# Allegro board mib_rev2_v143.brd
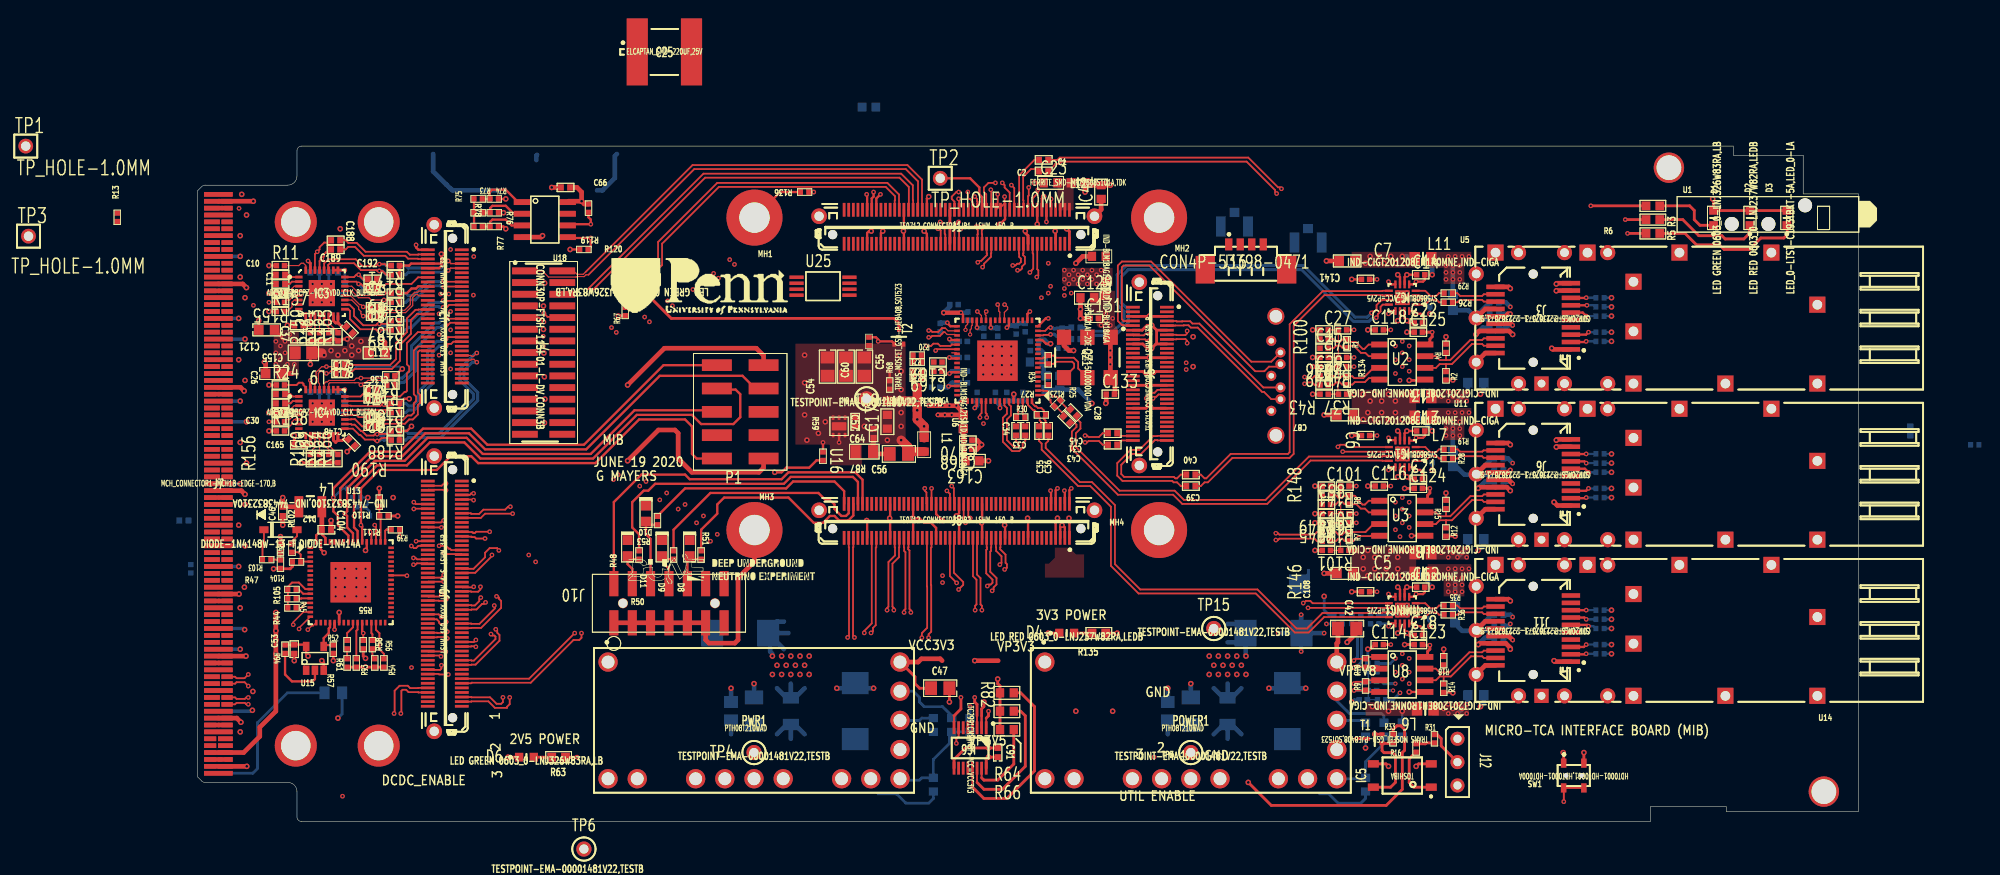
[diagram p0: board, top side]
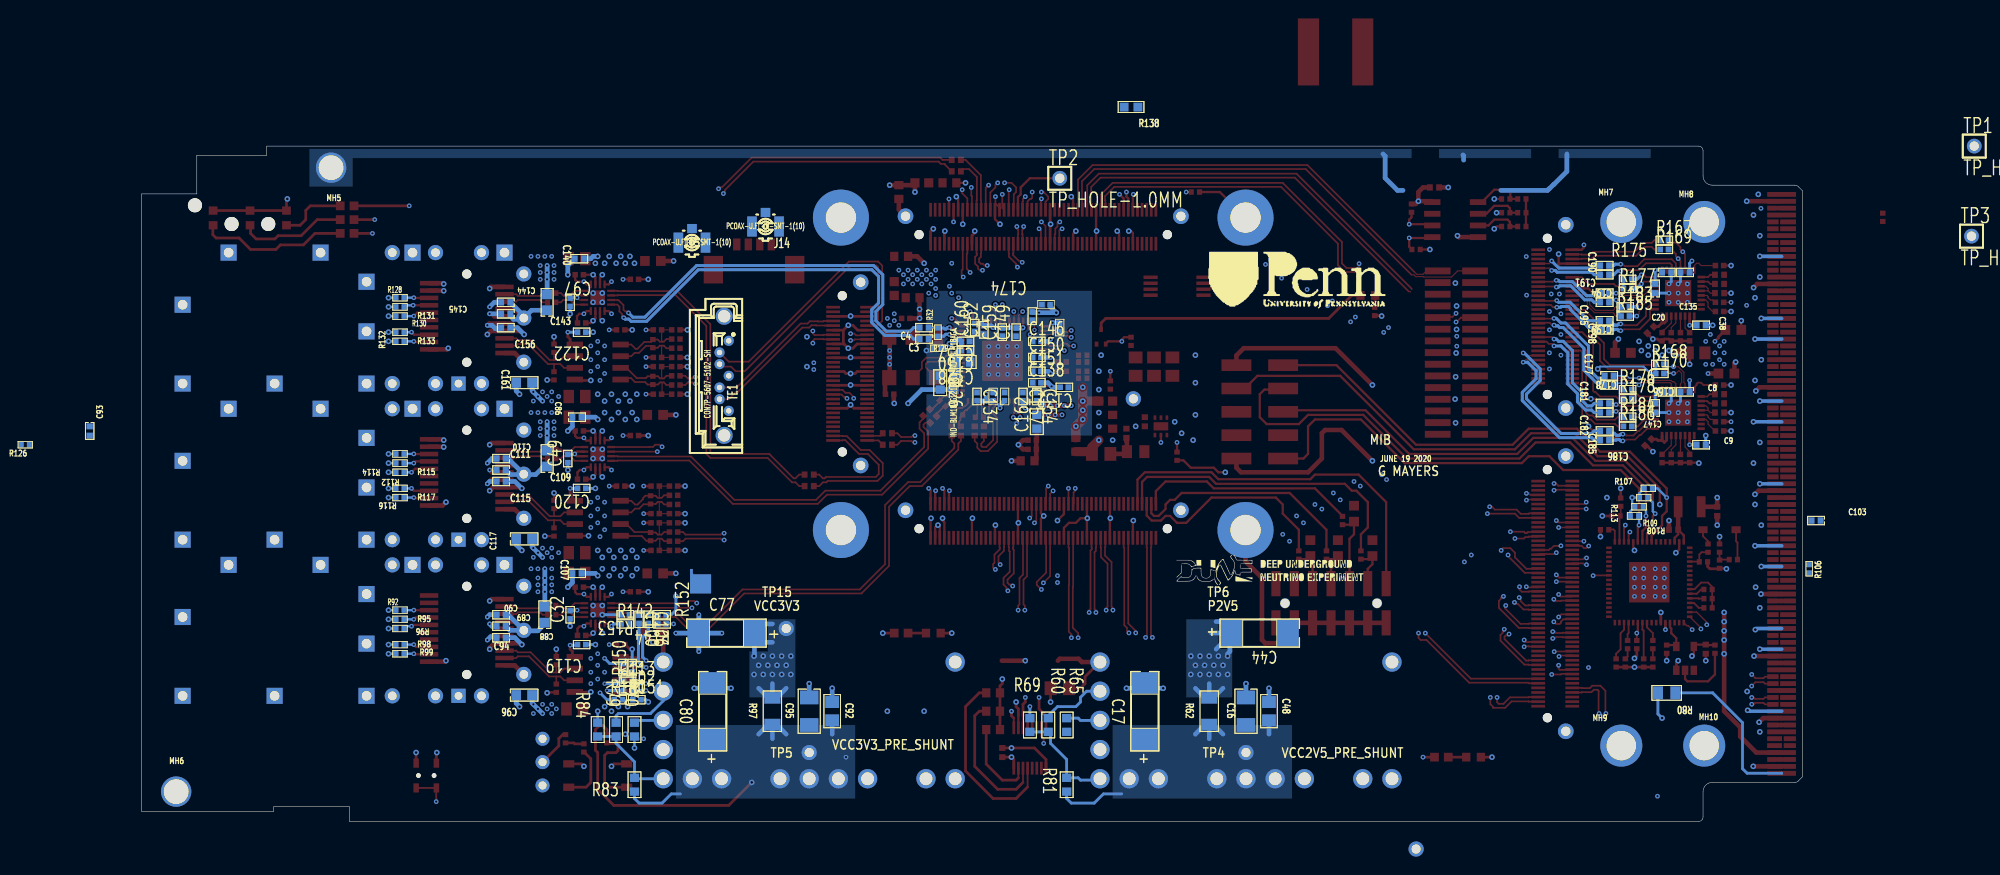
[diagram p1: board, bottom side, seen from below]

Outline 180.6 x 73.5 mm; copper layers: TOP, 02_GND, 03_SIG1, 04_GND, 05_PWR1, 06_GND, 07_SIG2, 08_GND, 09_SIG3, BOTTOM. Coordinates in mm from the lower left corner of the outline.
Outline path: 0,68.65 0.46,69.11 arc(0.62,69.21) 0.8,69.25 0.83,69.25 9.8,69.25 arc(10.51,69.54) 10.8,70.25 10.8,73.01 arc(10.95,73.36) 11.3,73.5 167,73.5 167,72.5 174.6,72.5 174.6,68.3 180.6,68.3 180.6,1.1 166.24,1.1 166.24,1.6 158,1.6 158,0 11.27,0 arc(11.06,0.06) 10.89,0.21 arc(10.82,0.34) 10.8,0.49 10.8,3.26 arc(10.5,3.96) 9.8,4.25 0.8,4.25 arc(0.62,4.29) 0.46,4.39 0,4.85 0,68.65

## Design rules (mm)
constraint set DEFAULT: min track width 0.127
net group AMC_N_PS: nets AMC_N_PS<0> AMC_N_PS<1>
net group AUXIO_0: nets AUXIO_N0 AUXIO_P0
net group AUXIO_1: nets AUXIO_N1 AUXIO_P1
net group AUXIO_2: nets AUXIO_N2 AUXIO_P2
net group AUXIO_3: nets AUXIO_N3 AUXIO_P3
net group AUXIO_4: nets AUXIO_N4 AUXIO_P4
net group AUXIO_5: nets AUXIO_N5 AUXIO_P5
net group AUXIO_6: nets AUXIO_N6 AUXIO_P6
net group AUXIO_7: nets AUXIO_N7 AUXIO_P7
net group CLK_TST: nets CLK_TST_N CLK_TST_P
net group CLKIN0: nets CLKIN0_N CLKIN0_P
net group CLKIN1: nets CLKIN1_N CLKIN1_P
net group CLKIN2: nets CLKIN2_N CLKIN2_P
net group CLKIN3: nets CLKIN3_N CLKIN3_P
net group DP1: nets RCLK_N0 RCLK_N1
net group DP2: nets RCLK_P0 RCLK_P1
net group DP_AUX_GBE_RX: nets AUX_GBE_RX_N AUX_GBE_RX_P
net group DP_AUX_GBE_TX: nets AUX_GBE_TX_N AUX_GBE_TX_P
net group DP_CLK0: nets CLK_N<0> CLK_P<0>
net group DP_CLK1: nets CLK_N<1> CLK_P<1>
net group DP_DATA_IN0: nets DATA_IN_N<0> DATA_IN_P<0>
net group DP_DATA_IN1: nets DATA_IN_N<1> DATA_IN_P<1>
net group DP_DATA_IN2: nets DATA_IN_N<2> DATA_IN_P<2>
net group DP_DATA_IN3: nets DATA_IN_N<3> DATA_IN_P<3>
net group DP_DATA_IN4: nets DATA_IN_N<4> DATA_IN_P<4>
net group DP_DATA_IN5: nets DATA_IN_N<5> DATA_IN_P<5>
net group DP_DATA_IN6: nets DATA_IN_N<6> DATA_IN_P<6>
net group DP_DATA_IN7: nets DATA_IN_N<7> DATA_IN_P<7>
net group DP_DATA_IN8: nets DATA_IN_N<8> DATA_IN_P<8>
net group DP_DATA_IN9: nets DATA_IN_N<9> DATA_IN_P<9>
net group DP_DATA_IN10: nets DATA_IN_N<10> DATA_IN_P<10>
net group DP_DATA_IN11: nets DATA_IN_N<11> DATA_IN_P<11>
net group DP_DATA_OUT0: nets DATA_OUT_N<0> DATA_OUT_P<0>
net group DP_DATA_OUT1: nets DATA_OUT_N<1> DATA_OUT_P<1>
net group DP_DATA_OUT2: nets DATA_OUT_N<2> DATA_OUT_P<2>
net group DP_DATA_OUT3: nets DATA_OUT_N<3> DATA_OUT_P<3>
net group DP_DATA_OUT4: nets DATA_OUT_N<4> DATA_OUT_P<4>
net group DP_DATA_OUT5: nets DATA_OUT_N<5> DATA_OUT_P<5>
net group DP_DATA_OUT6: nets DATA_OUT_N<6> DATA_OUT_P<6>
net group DP_DATA_OUT7: nets DATA_OUT_N<7> DATA_OUT_P<7>
net group DP_DATA_OUT8: nets DATA_OUT_N<8> DATA_OUT_P<8>
net group DP_DATA_OUT9: nets DATA_OUT_N<9> DATA_OUT_P<9>
net group DP_DATA_OUT10: nets DATA_OUT_N<10> DATA_OUT_P<10>
net group DP_DATA_OUT11: nets DATA_OUT_N<11> DATA_OUT_P<11>
net group DP_DC_REF_CLK0: nets DC_REF_CLK_N<0> DC_REF_CLK_P<0>
net group DP_DC_REF_CLK1: nets DC_REF_CLK_N<1> DC_REF_CLK_P<1>
net group DP_DC_REF_CLK2: nets DC_REF_CLK_N<2> DC_REF_CLK_P<2>
net group DP_DC_REF_CLK3: nets DC_REF_CLK_N<3> DC_REF_CLK_P<3>
net group DP_DC_REF_CLK4: nets DC_REF_CLK_N<4> DC_REF_CLK_P<4>
net group DP_DC_REF_CLK5: nets DC_REF_CLK_N<5> DC_REF_CLK_P<5>
net group DP_DC_REF_CLK6: nets DC_REF_CLK_N<6> DC_REF_CLK_P<6>
net group DP_DC_REF_CLK7: nets DC_REF_CLK_N<7> DC_REF_CLK_P<7>
net group DP_DC_REF_CLK8: nets DC_REF_CLK_N<8> DC_REF_CLK_P<8>
net group DP_DC_REF_CLK9: nets DC_REF_CLK_N<9> DC_REF_CLK_P<9>
net group DP_DC_REF_CLK10: nets DC_REF_CLK_N<10> DC_REF_CLK_P<10>
net group DP_DC_REF_CLK11: nets DC_REF_CLK_N<11> DC_REF_CLK_P<11>
net group DP_DFF_REF_CLK0: nets DFF_REF_CLK_N<0> DFF_REF_CLK_P<0>
net group DP_DFF_REF_CLK1: nets DFF_REF_CLK_N<1> DFF_REF_CLK_P<1>
net group DP_DFF_REF_CLK2: nets DFF_REF_CLK_N<2> DFF_REF_CLK_P<2>
net group DP_GBE_RX: nets GBE_RX_N GBE_RX_P
net group DP_GBE_TX: nets GBE_TX_N GBE_TX_P
net group DP_REF_CLK0: nets REF_CLK_N<0> REF_CLK_P<0>
net group DP_REF_CLK1: nets REF_CLK_N<1> REF_CLK_P<1>
net group DP_REF_CLK2: nets REF_CLK_N<2> REF_CLK_P<2>
net group DP_REF_CLK3: nets REF_CLK_N<3> REF_CLK_P<3>
net group DP_REF_CLK4: nets REF_CLK_N<4> REF_CLK_P<4>
net group DP_REF_CLK5: nets REF_CLK_N<5> REF_CLK_P<5>
net group DP_REF_CLK6: nets REF_CLK_N<6> REF_CLK_P<6>
net group DP_REF_CLK7: nets REF_CLK_N<7> REF_CLK_P<7>
net group DP_REF_CLK8: nets REF_CLK_N<8> REF_CLK_P<8>
net group DP_REF_CLK9: nets REF_CLK_N<9> REF_CLK_P<9>
net group DP_REF_CLK10: nets REF_CLK_N<10> REF_CLK_P<10>
net group DP_REF_CLK11: nets REF_CLK_N<11> REF_CLK_P<11>
net group DP_SFP_TD0: nets SFP_TD_N<0> SFP_TD_P<0>
net group DP_SFP_TD1: nets SFP_TD_N<1> SFP_TD_P<1>
net group DP_SFP_TD2: nets SFP_TD_N<2> SFP_TD_P<2>
net group DP_TIMING.UPSTREAM_DATA0: nets TIMING.UPSTREAM_DATA_N<0> TIMING.UPSTREAM_DATA_P<0>
net group DP_TIMING.UPSTREAM_DATA1: nets TIMING.UPSTREAM_DATA_N<1> TIMING.UPSTREAM_DATA_P<1>
net group DP_XTAL: nets XA XB
net group DPDATA_FROM_UPSTREAM0: nets DATA_FROM_UPSTREAM_N<0> DATA_FROM_UPSTREAM_P<0>
net group DPDATA_FROM_UPSTREAM1: nets DATA_FROM_UPSTREAM_N<1> DATA_FROM_UPSTREAM_P<1>
net group DPDATA_FROM_UPSTREAM2: nets DATA_FROM_UPSTREAM_N<2> DATA_FROM_UPSTREAM_P<2>
net group DPDFF_CLK0: nets DFF_CLK_N<0> DFF_CLK_P<0>
net group DPDFF_CLK1: nets DFF_CLK_N<1> DFF_CLK_P<1>
net group DPDFF_CLK2: nets DFF_CLK_N<2> DFF_CLK_P<2>
net group DPSFP_DATA_OUT0: nets SFP_DATA_OUT_N<0> SFP_DATA_OUT_P<0>
net group DPSFP_DATA_OUT1: nets SFP_DATA_OUT_N<1> SFP_DATA_OUT_P<1>
net group DPSFP_DATA_OUT2: nets SFP_DATA_OUT_N<2> SFP_DATA_OUT_P<2>
net group DPUDATA_IN0: nets UDATA_IN_N<0> UDATA_IN_P<0>
net group DPUDATA_IN1: nets UDATA_IN_N<1> UDATA_IN_P<1>
net group DPUDATA_IN2: nets UDATA_IN_N<2> UDATA_IN_P<2>
net group FBCLK: nets FBCLK_N FBCLK_P
net group REFCLK_OUT0: nets REFCLK_OUT0_N REFCLK_OUT0_P
net group REFCLK_OUT1: nets REFCLK_OUT1_N REFCLK_OUT1_P
net group SCOPE: nets SCOPE_N SCOPE_P
net group SFP0_CLKGEN: nets SFP0_CLKGEN_N SFP0_CLKGEN_P
net group SFP1_CLKGEN: nets SFP1_CLKGEN_N SFP1_CLKGEN_P
net group SFP2_CLKGEN: nets SFP2_CLKGEN_N SFP2_CLKGEN_P
net group AMC_GA: nets AMC_GA<0> AMC_GA<1> AMC_GA<2>
net group BP_1: nets AMC_N_ENABLE IMPB_SCL IMPB_SDA PWR_ON TCK_2 TDI_2 TDO_2 TMS_2
net group CLKGEN_IO_1: nets CLK_INTR CLK_LOL CLK_RST CLK_SCL CLK_SDA CLK_SEL0 CLK_SEL1
net group POWER: nets DCDC_2V5_PG DCDC_3V3_PG DCDC_ENABLE LDO_1V8_PG SENSE_I2C_SCL SENSE_I2C_SDA
net group SFP_LOS: nets SFP_LOS<0> SFP_LOS<1> SFP_LOS<2>
net group SFP_RATE_SELECT: nets SFP_RATE_SELECT<0> SFP_RATE_SELECT<1> SFP_RATE_SELECT<2>
net group SFP_RD_N: nets SFP_RD_N<0> SFP_RD_N<1> SFP_RD_N<2>
net group SFP_RD_P: nets SFP_RD_P<0> SFP_RD_P<1> SFP_RD_P<2>
net group SFP_SCL: nets SFP_SCL<0> SFP_SCL<1> SFP_SCL<2>
net group SFP_SDA: nets SFP_SDA<0> SFP_SDA<1> SFP_SDA<2>
net group SFP_TX_DISABLE: nets SFP_TX_DISABLE<0> SFP_TX_DISABLE<1> SFP_TX_DISABLE<2>
net group SFP_TX_FAULT: nets SFP_TX_FAULT<0> SFP_TX_FAULT<1> SFP_TX_FAULT<2>
net group TIMING.UPSTREAM_DATA_N: nets TIMING.UPSTREAM_DATA_N<2>
net group TIMING.UPSTREAM_DATA_P: nets TIMING.UPSTREAM_DATA_P<2>
net group UPSTREAM_DATA_N_: nets UPSTREAM_DATA_N_<0> UPSTREAM_DATA_N_<1> UPSTREAM_DATA_N_<2>
net group UPSTREAM_DATA_P: nets UPSTREAM_DATA_P<0> UPSTREAM_DATA_P<1> UPSTREAM_DATA_P<2>
net group VIN: nets VP12

## Placement (name value [footprint] x y rotation side)
C1  0.1UF  [CAP0402]  92.01 70.75 0 top
C2  0.1UF  [CAP0402]  92.01 72 0 top
C3  0.1UF  [CAP0402]  95.51 52.5 180 bottom
C4  0.1UF  [CAP0402]  95.51 53.75 180 bottom
C5  1uF  [C0402]  127.01 25 0 top
C6  1uF  [C0402]  127.01 42 0 top
C7  1uF  [C0402]  127.01 59 0 top
C8  100nF  [CAP0402]  12.76 46.75 180 bottom
C9  1UF  [CAP0402]  11.01 41 180 bottom
C10  0.1UF  [CAP0402]  9.01 59.5 0 top
C11  0.1UF  [CAP0402]  9.01 58.5 0 top
C12  100nF  [C0402]  133.01 25.5 0 top
C13  100nF  [C0402]  133.01 42.5 0 top
C14  100nF  [C0402]  133.01 59.5 0 top
C15  100nF  [C0402]  122.51 51.5 0 top
C16  100UF  [CAP1206]  60.51 12 90 bottom
C17  470UF  [CAP2917]  71.51 12 90 bottom
C18  1nF  [C0402]  132.76 20.25 0 top
C19  100nF  [CAP0402]  14.76 59.75 0 bottom
C20  1UF  [CAP0402]  16.01 58 270 bottom
C21  1nF  [C0402]  132.76 37.25 0 top
C22  1nF  [C0402]  132.76 54.25 0 top
C23  1uF  [C0603]  92.76 69.5 0 top
C24  100nF  [C0402]  122.51 47.5 0 top
C25  220uF  [CTE_VISHAY_597D-M]  50.76 83.75 0 top
C26  0.1UF  [CAP0402]  9.01 46.5 0 top
C27  100nF  [C0402]  122.51 52.5 0 top
C28  0.1UF  [CAP0402]  95.26 44.5 135 top
C29  100nF  [C0402]  122.51 48.5 0 top
C30  0.1UF  [CAP0402]  9.01 45.5 0 top
C31  0.1UF  [CAP0402]  94.51 43.75 135 top
C32  100nF  [C0402]  134.01 22.5 90 bottom
C33  0.1UF  [CAP0402]  90.01 42.5 90 top
C34  0.1UF  [CAP0402]  89.01 42.5 90 top
C35  0.1UF  [CAP0402]  91.51 42.5 90 top
C36  0.1UF  [CAP0402]  92.51 42.5 90 top
C37  100nF  [CAP0402]  11.01 54 0 top
C38  1UF  [CAP0402]  11.01 54 180 bottom
C39  0.1UF  [CAP0402]  108.01 36.5 0 top
C40  0.1UF  [CAP0402]  108.01 37.75 0 top
C41  1uF  [C0603]  98.26 68.5 90 top
C42  0.1UF  [CAP0805]  125.01 21 0 top
C43  0.1UF  [CAP0402]  99.51 41 180 top
C44  470UF  [CAP2917]  59.01 20.5 180 bottom
C45  0.1UF  [CAP0402]  99.51 42.25 180 top
C46  0.47UF  [CAP0402]  9.26 33.75 270 top
C47  0.1UF  [CAP0805]  80.76 14.5 0 top
C48  0.1UF  [CAP0805]  58.01 12 90 bottom
C49  100nF  [C0402]  134.26 39.5 90 bottom
C53  0.1UF  [CAP0402]  10.51 18.75 270 top
C54  47UF  [CAP0805]  68.51 49.5 90 top
C55  47UF  [CAP0805]  72.51 49.5 90 top
C56  47UF  [CAP0805]  76.26 40 0 top
C57  0.1UF  [CAP0402]  71.51 43.5 270 top
C60  47UF  [CAP0805]  70.51 49.5 90 top
C64  0.1UF  [CAP0402]  73.51 42.25 90 top
C66  0.1UF  [CAP0402]  40.01 69 180 top
C77  470UF  [CAP2917]  117.01 20.5 0 bottom
C80  470UF  [CAP2917]  118.51 12 90 bottom
C86  0.1UF  [CAP0402]  133.26 44 0 bottom
C87  10UF  [CAP0603]  124.76 44.25 180 top
C88  22UF  [CAP0603]  136.76 22.5 270 bottom
C89  1UF  [CAP0402]  141.51 22.5 180 bottom
C90  0.1UF  [CAP0402]  141.51 21.25 180 bottom
C91  0.1UF  [CAP0402]  87.01 7.5 270 top
C92  0.1UF  [CAP0805]  105.51 12 90 bottom
C93  0.1UF  [CAP0402]  186.26 42.5 90 bottom
C94  0.1UF  [CAP0402]  141.51 20 180 bottom
C95  100UF  [CAP1206]  108.01 12 90 bottom
C96  22UF  [CAP0603]  139.01 13.75 0 bottom
C97  100nF  [C0402]  134.01 56.5 90 bottom
C98  100nF  [C0402]  122.76 34.5 0 top
C99  100nF  [C0402]  122.76 30.5 0 top
C100  100nF  [C0402]  126.51 22 270 bottom
C101  100nF  [C0402]  122.76 35.5 0 top
C102  100nF  [C0402]  127.76 14.25 180 bottom
C103  0.1UF  [CAP0402]  -1.49 32.75 180 bottom
C104  0.1UF  [CAP0402]  14.01 31.75 0 top
C105  100nF  [C0402]  122.76 31.5 0 top
C106  100nF  [C0402]  125.51 22 270 bottom
C107  0.1UF  [CAP0402]  133.26 27 0 bottom
C108  10UF  [CAP0603]  124.76 27 180 top
C109  22UF  [CAP0603]  136.51 39.5 270 bottom
C110  1UF  [CAP0402]  141.51 39.5 180 bottom
C111  0.1UF  [CAP0402]  141.51 38.25 180 bottom
C112  10UF  [CAP0603]  19.51 51 0 top
C113  100nF  [C0402]  127.76 15.25 180 bottom
C114  1uF  [C0402]  128.51 19.25 0 top
C115  0.1UF  [CAP0402]  141.51 37 180 bottom
C116  1uF  [C0402]  128.51 36.5 0 top
C117  22UF  [CAP0603]  139.01 30.75 0 bottom
C118  1uF  [C0402]  128.51 53.5 0 top
C119  100nF  [C0402]  132.76 19.25 0 bottom
C120  100nF  [C0402]  132.76 36.25 0 bottom
C121  10UF  [CAP0603]  7.51 53.5 180 top
C122  100nF  [C0402]  132.76 53.25 0 bottom
C123  1nF  [C0402]  132.76 19.25 0 top
C124  1nF  [C0402]  132.76 36.25 0 top
C125  1nF  [C0402]  132.76 53.25 0 top
C126  10uF  [C0603]  93.76 47.75 270 bottom
C127  10uF  [C0603]  98.01 61.5 0 top
C128  10uF  [C0603]  91.26 50 0 bottom
C129  10uF  [C0603]  96.76 57 0 top
C130  1uF  [C0402]  91.01 51.25 0 bottom
C131  1uF  [C0402]  97.51 54.75 0 top
C132  1uF  [C0402]  80.26 47.25 0 bottom
C133  100nF  [C0402]  99.26 46.5 0 top
C134  1uF  [C0402]  89.76 46.25 270 bottom
C135  100nF  [CAP0402]  12.76 59.75 180 bottom
C136  100nF  [CAP0402]  16.51 53.5 135 top
C137  100nF  [C0402]  91.01 52.25 0 bottom
C138  100nF  [C0402]  83.26 47.75 180 bottom
C139  100nF  [CAP0402]  9.01 44.5 0 top
C140  0.1UF  [CAP0402]  133.01 61.25 0 bottom
C141  10UF  [CAP0603]  125.01 61 180 top
C142  100nF  [C0402]  88.01 46.25 270 bottom
C143  22UF  [CAP0603]  136.51 56.5 270 bottom
C144  1UF  [CAP0402]  141.01 56.5 180 bottom
C145  0.1UF  [CAP0402]  141.01 55.25 180 bottom
C146  100nF  [C0402]  83.26 52.25 180 bottom
C147  1UF  [CAP0402]  16.01 45 270 bottom
C148  100nF  [CAP0402]  16.76 41.25 135 top
C149  100nF  [C0402]  85.51 53.25 90 bottom
C150  100nF  [C0402]  83.26 50.5 180 bottom
C151  100nF  [C0402]  83.26 49 180 bottom
C152  100nF  [C0402]  89.01 53.5 90 bottom
C153  100nF  [C0402]  80.76 53.75 90 bottom
C154  100nF  [C0402]  83.26 46.25 270 bottom
C155  10UF  [CAP0603]  8.26 48.75 180 top
C156  0.1UF  [CAP0402]  141.01 53.75 180 bottom
C157  100nF  [C0402]  84.76 46.25 270 bottom
C158  100nF  [C0402]  86.76 46.25 270 bottom
C159  100nF  [C0402]  87.01 53.25 90 bottom
C160  1uF  [C0402]  90.01 53.75 90 bottom
C161  22UF  [CAP0603]  139.01 47.75 0 bottom
C162  10uF  [C0603]  83.26 43.5 90 bottom
C163  10uF  [C0603]  84.26 39.25 180 top
C165  100nF  [CAP0402]  11.01 41 0 top
C166  100nF  [CAP0402]  14.76 46.75 0 bottom
C167  100nF  [C0402]  80.51 50 180 top
C168  1uF  [C0402]  83.76 40.5 180 top
C169  100nF  [C0402]  80.51 49 180 top
C170  100nF  [C0402]  83.76 41.5 180 top
C171  10uF  [C0603]  75.01 43.5 90 top
C172  10uF  [C0603]  79.01 41 90 top
C173  1uF  [C0402]  82.26 56.25 180 bottom
C174  100nF  [C0402]  83.76 55 90 bottom
C175  100nF  [CAP0402]  15.51 49.75 0 top
C176  100nF  [CAP0402]  15.51 48.75 0 top
C177  100nF  [CAP0402]  21.01 48.5 0 bottom
C178  100nF  [CAP0402]  21.01 47.5 0 bottom
C179  100nF  [CAP0402]  19.01 47 0 top
C180  100nF  [CAP0402]  19.01 46 0 top
C181  100nF  [CAP0402]  21.51 45.5 0 bottom
C182  100nF  [CAP0402]  21.51 44.5 0 bottom
C183  100nF  [CAP0402]  19.01 44 0 top
C184  100nF  [CAP0402]  19.01 43 0 top
C185  100nF  [CAP0402]  21.51 42.5 0 bottom
C186  100nF  [CAP0402]  21.51 41.5 0 bottom
C187  100nF  [CAP0402]  9.01 57.5 0 top
C188  100nF  [CAP0402]  15.01 63.25 0 top
C189  100nF  [CAP0402]  15.01 62.25 0 top
C190  100nF  [CAP0402]  21.51 60.5 0 bottom
C191  100nF  [CAP0402]  21.51 59.5 0 bottom
C192  100nF  [CAP0402]  19.01 59 0 top
C193  100nF  [CAP0402]  19.01 58 0 top
C194  100nF  [CAP0402]  21.51 57.5 0 bottom
C195  100nF  [CAP0402]  21.51 56.5 0 bottom
C196  100nF  [CAP0402]  19.26 56 0 top
C197  100nF  [CAP0402]  19.26 55 0 top
C198  100nF  [CAP0402]  21.51 54.5 0 bottom
C199  100nF  [CAP0402]  21.51 53.5 0 bottom
D1  GREEN  [LEDC1608X80N]  164.85 65.68 90 top
D2  RED  [LEDC1608X80N]  168.81 65.68 90 top
D3  LTST-C170TBKT  [LEDC1608X80N]  172.83 65.68 90 top
D4  RED  [LEDC1608X80N]  94.51 20.5 0 top
D5  GREEN  [LEDC1608X80N]  47.26 57.25 180 top
D6  GREEN  [LEDC1608X80N]  35.76 7 0 top
D8  PGB1010603NR  [D0603]  53.51 29.75 270 top
D9  PGB1010603NR  [D0603]  50.51 29.75 270 top
D10  PGB1010603NR  [D0603]  48.76 33.5 270 top
D11  PGB1010603NR  [D0603]  46.76 29.75 270 top
D12  1N4148  [SOD123]  9.01 31.75 0 top
IC1  -  [QFN50P300X300X90-17N-S160]  131.01 40 180 top
IC2  -  [QFN50P300X300X90-17N-S160]  131.01 57 180 top
IC3  -  [QFN50P500X500X100-33N-S285]  13.51 57.5 0 top
IC4  -  [QFN50P500X500X100-33N-S285]  13.51 44.5 0 top
IC5  -  [TOSHIBA_11-4M1S]  131.01 5 180 top
IC6  -  [SOP50P490X110-16N]  84.01 8 270 top
J1  LSHM-150-03.0-L-DV-A-S-K-TR  [SAMTEC_LSHM-150-04-0-L-DV-A-S]  82.56 64.77 0 top
J2  LSHM-130-03.0-L-DV-A-S-K-TR  [SAMTEC_LSHM-130-04-0-L-DV-A-S]  26.83 54.97 90 top
J3  1367073-1  [TYCO_1367073]  145.24 54.77 180 top
J4  -  [FTSH-115-01-L-DV]  37.62 51.66 270 top
J5  LSHM-130-03.0-L-DV-A-S-K-TR  [SAMTEC_LSHM-130-04-0-L-DV-A-S]  103.51 48.72 90 top
J6  1367073-1  [TYCO_1367073]  145.24 37.78 180 top
J7  MCH_TG1-EDGE-170  [AMC0_R2_BPLUS_PCB_EDGE]  2.25 36.75 0 top
J8  LSHM-150-03.0-L-DV-A-S-K-TR  [SAMTEC_LSHM-150-04-0-L-DV-A-S]  82.56 32.77 0 top
J9  LSHM-150-03.0-L-DV-A-S-K-TR  [SAMTEC_LSHM-150-04-0-L-DV-A-S]  26.83 24.79 90 top
J10  7X2RECPT_SMD_2MM  [HDR14PINSMD]  51.26 23.75 180 top
J11  1367073-1  [TYCO_1367073]  145.24 20.79 180 top
J12  HDR1X3  [HDR_1X3]  137.01 9 270 top
J14  -  [HIROSE_U-FL-R-SMT-1_10]  112.76 64.75 180 bottom
J15  -  [HIROSE_U-FL-R-SMT-1_10]  120.76 63 180 bottom
J16  -  [MOLEX_53398-0471]  112.76 61 0 top
L1  120  OHM@100MHZ  [INDC1608X95N]  83.26 43.5 270 top
L2  120  OHM@100MHZ  [INDC1608X95N]  98.76 58 270 top
L3  120  OHM@100MHZ  [INDC1608X95N]  92.26 47.75 90 bottom
L4  10 UH  [INDC2520X220N]  12.26 34.25 180 top
L5  1 UH  [INDC2013X105N]  133.26 27 0 top
L6  1 UH  [INDC2013X105N]  133.51 12.25 180 top
L7  1 UH  [INDC2013X105N]  133.26 44 0 top
L8  1 UH  [INDC2013X105N]  133.26 29.25 180 top
L9  -  [C0805]  11.51 51 180 top
L10  120  OHM@100MHZ  [INDC1608X95N]  75.76 45.75 0 top
L11  1 UH  [INDC2013X105N]  133.26 61.25 0 top
L12  100R@100MHz  [INDC1608X95N]  95.76 69.5 0 top
L13  1 UH  [INDC2013X105N]  133.26 46.25 180 top
MH1  MT_HOLE  [MOUNTHOLE]  60.56 65.72 0 top
MH2  MT_HOLE  [MOUNTHOLE]  104.56 65.72 0 top
MH3  MT_HOLE  [MOUNTHOLE]  60.56 31.72 0 top
MH4  MT_HOLE  [MOUNTHOLE]  104.56 31.72 0 top
MH5  MT_HOLE  [MOUNTHOLE]  160 71.15 180 bottom
MH6  MT_HOLE  [MOUNTHOLE]  176.85 3.25 180 bottom
MH7  MT_HOLE  [MOUNTHOLE]  19.69 65.25 180 bottom
MH8  MT_HOLE  [MOUNTHOLE]  10.67 65.25 180 bottom
MH9  MT_HOLE  [MOUNTHOLE]  19.69 8.26 180 bottom
MH10  MT_HOLE  [MOUNTHOLE]  10.67 8.26 180 bottom
NOREF  -  []  157.38 0 90 top
NOREF#2  -  []  167 73.04 0 top
NOREF#3  -  []  15.11 0 90 top
NOREF#4  -  []  -255.82 -99.62 0 top
NOREF#5  -  []  0 39.45 0 top
NOREF#6  -  []  153.92 4.25 0 top
NOREF#7  -  []  153.74 4.81 0 top
NOREF#8  -  []  23.75 102.67 90 top
NOREF#9  -  []  12.04 125.75 90 top
NOREF#10  -  []  158 0.73 0 top
NOREF#11  -  []  178.32 68.3 90 top
NOREF#12  -  []  0 64.12 0 top
NOREF#13  -  []  44.48 53.98 0 top
NOREF#14  -  []  -26.64 123.32 0 top
NOREF#15  -  []  -27.5 136.85 0 top
NOREF#16  -  []  5.36 4.25 90 top
NOREF#17  -  []  46.82 25.83 0 top
NOREF#18  -  []  10.8 72.31 0 top
NOREF#19  -  []  -27.5 124.03 0 top
NOREF#20  -  []  161.05 4 90 top
NOREF#21  -  []  0.92 4.25 90 top
NOREF#22  -  []  65.03 54.66 180 bottom
NOREF#23  -  []  12.32 141.05 270 bottom
NOREF#24  -  []  68.05 25.73 180 bottom
P1  RECP5X2  [RECPT5X2_100MIL_SM]  59.01 39.5 0 top
POWER1  -  [PWS_TI_ECP-R-PDSS-T14]  108.01 11 0 top
PWR1  -  [PWS_TI_ECP-R-PDSS-T14]  60.51 11 0 top
QZ1  50MHz  [OSCSC254P500X700X100-6N]  96.76 50.5 270 top
R1  100  [RES0402]  125.01 52 90 top
R2  100  [RES0402]  135.76 48.5 90 top
R3  249 OHM  [RES0603]  158.26 67 180 top
R4  100  [RES0402]  135.76 51.5 270 top
R5  249 OHM  [RES0603]  158.26 65.5 180 top
R6  160 OHM  [RES0603]  158.26 64 180 top
R7  100  [RES0402]  125.26 31 90 top
R8  100  [RES0402]  125.26 35 90 top
R9  100  [RES0402]  127.01 14.75 90 top
R10  100  [RES0402]  127.01 17.25 90 top
R11  1k  [C0402]  9.01 60.5 0 top
R12  100  [RES0402]  135.76 31.5 90 top
R13  4.99K  [RES0402]  -8.74 65.75 270 top
R14  100  [RES0402]  135.51 14.5 90 top
R15  100  [RES0402]  135.76 34.5 270 top
R16  24.9  [RES0402]  132.51 8 90 top
R18  100  [RES0402]  135.51 17.5 270 top
R19  0  [RES0402]  136.01 40.5 180 top
R20  49.9  [RES0402]  78.26 50.75 180 top
R21  499 OHM  [RES0402]  78.26 50 180 top
R22  499 OHM  [RES0402]  78.26 49 180 top
R23  49.9  [RES0402]  78.26 48.25 180 top
R24  1k  [C0402]  9.01 47.5 0 top
R25  100  [RES0402]  93.51 45.5 45 top
R26  0  [RES0402]  136.01 57.5 180 top
R27  100  [RES0402]  91.76 44.25 0 top
R28  0  [RES0402]  136.01 39.5 180 top
R29  0  [RES0402]  136.01 56.5 180 top
R30  100  [RES0402]  89.51 44 0 top
R31  24.9  [RES0402]  134.51 9 90 top
R32  100  [RES0402]  94.01 53.25 90 bottom
R33  150K  [RES0402]  130.01 9 270 top
R34  100  [RES0402]  92.51 50.25 270 top
R35  0  [RES0402]  136.01 23.5 180 top
R36  0  [RES0402]  136.01 22.5 180 top
R37  1k  [C0402]  124.51 46.5 180 top
R38  1k  [C0402]  124.51 50.5 180 top
R39  33K  [RES0402]  21.51 31.75 180 top
R40  1k  [C0402]  124.51 49.5 180 top
R41  4.7K  [RES0402]  9.01 29.75 270 top
R42  1k  [C0402]  124.51 53.5 180 top
R43  2.2k  [C0402]  122.51 46.5 180 top
R44  33K  [RES0402]  10.26 25.25 0 top
R45  33K  [RES0402]  10.26 24.25 0 top
R46  2.2k  [C0402]  122.51 50.5 180 top
R47  33K  [RES0402]  10.26 23.25 0 top
R48  24.9  [RES0402]  50.01 32.75 90 top
R49  2.2k  [C0402]  122.51 49.5 180 top
R50  24.9  [RES0402]  51.76 29 90 top
R51  24.9  [RES0402]  54.76 29 90 top
R52  4.7K  [RES0402]  14.76 18.75 90 top
R53  24.9  [RES0402]  48.01 29 90 top
R54  2.2K  [RES0402]  20.26 17.25 90 top
R55  49.9  [RES0402]  16.26 19.25 270 top
R56  49.9  [RES0402]  19.01 19.25 270 top
R57  33K  [RES0402]  16.26 17.25 90 top
R58  2.2K  [RES0402]  19.26 17.25 90 top
R59  4.99K  [RES0402]  68.01 39.75 90 top
R60  1.6k  [C0603]  80.01 10.5 90 bottom
R61  33K  [RES0402]  18.01 19.25 90 top
R62  0.005  [RES1206]  64.51 12 90 bottom
R63  249 OHM  [RES0603]  39.26 7 0 top
R64  00  [C0603]  88.01 12 0 top
R65  XX  [C0603]  82.01 10.5 270 bottom
R66  00  [C0603]  88.01 10 0 top
R67  4.99K  [RES0402]  46.51 55.5 90 top
R68  1K  [RES0402]  75.26 47.5 90 top
R69  00  [C0603]  84.01 10.5 90 bottom
R70  1.6k  [C0603]  127.01 10 90 bottom
R72  10K  [RES0402]  73.01 52.25 270 top
R73  0  [RES0402]  30.51 67.75 180 top
R74  -  [RES0402]  32.26 67.75 180 top
R75  0  [RES0402]  30.51 66.25 180 top
R76  -  [RES0402]  32.26 66.25 180 top
R77  0  [RES0402]  30.51 64.75 180 top
R78  -  [RES0402]  32.26 64.75 180 top
R79  XX  [C0603]  129.01 10 270 bottom
R80  0  [RES0805]  14.76 14 0 bottom
R81  XX  [C0603]  80.01 4 90 bottom
R82  00  [C0603]  88.01 14 0 top
R83  XX  [C0603]  127.01 4 90 bottom
R84  00  [C0603]  131.01 10 90 bottom
R87  0.02  [RES0805]  72.51 40.25 180 top
R92  4.99K  [RES0402]  152.51 23 180 bottom
R93  33K  [RES0402]  17.26 17.25 90 top
R94  10K  [RES0402]  9.51 18.75 270 top
R95  4.99K  [RES0402]  152.51 22 180 bottom
R96  4.99K  [RES0402]  152.51 21 180 bottom
R97  0.005  [RES1206]  112.01 12 90 bottom
R98  4.99K  [RES0402]  152.51 19.25 180 bottom
R99  4.99K  [RES0402]  152.51 18.25 180 bottom
R100  2.2k  [C0402]  122.51 53.5 180 top
R101  1k  [C0402]  124.76 29.5 180 top
R102  33  [RES0402]  10.26 29.75 90 top
R103  150K  [RES0402]  7.51 28.5 180 top
R104  390K  [RES0402]  10.76 28.25 180 top
R105  330  [RES0402]  9.01 28 270 top
R106  10K  [RES0402]  -0.74 27.5 270 bottom
R107  1K  [RES0402]  16.76 36.25 180 bottom
R108  1K  [RES0402]  17.26 35.25 180 bottom
R109  1K  [RES0402]  17.76 34.25 180 bottom
R110  30K  [RES0402]  20.26 33.25 180 top
R111  150K  [RES0402]  19.76 34.75 90 top
R112  4.99K  [RES0402]  152.51 40 180 bottom
R113  1K  [RES0402]  18.26 33.25 180 bottom
R114  4.99K  [RES0402]  152.51 39 180 bottom
R115  4.99K  [RES0402]  152.51 38 180 bottom
R116  4.99K  [RES0402]  152.51 36.25 180 bottom
R117  4.99K  [RES0402]  152.51 35.25 180 bottom
R118  1k  [C0402]  124.76 33.5 180 top
R119  2.2K  [RES0402]  42.51 66.75 270 top
R120  2.2K  [RES0402]  42.01 62.25 0 top
R123  4.99K  [RES0402]  92.51 48 270 top
R126  2.2K  [RES0402]  193.26 41 0 bottom
R128  4.99K  [RES0402]  152.51 57 180 bottom
R129  4.99K  [RES0402]  94.01 51.5 180 bottom
R130  4.99K  [RES0402]  152.51 56 180 bottom
R131  4.99K  [RES0402]  152.51 55 180 bottom
R132  4.99K  [RES0402]  152.51 53.25 180 bottom
R133  4.99K  [RES0402]  152.51 52.25 180 bottom
R134  100  [RES0402]  125.01 48 90 top
R135  249 OHM  [RES0603]  98.01 20.5 0 top
R136  10K  [RES0402]  66.01 68.5 180 top
R138  10M  [RES0603]  73.01 77.75 180 bottom
R139  1k  [C0402]  124.76 32.5 180 top
R140  1k  [C0402]  128.76 13.25 180 bottom
R141  1k  [C0402]  124.76 36.5 180 top
R142  1k  [C0402]  128.01 21.5 180 bottom
R143  1k  [C0402]  128.26 16.75 270 bottom
R144  1k  [C0402]  124.01 21.5 0 bottom
R145  2.2k  [C0402]  122.76 32.5 180 top
R146  2.2k  [C0402]  122.76 29.5 180 top
R148  2.2k  [C0402]  122.76 36.5 180 top
R149  2.2k  [C0402]  122.76 33.5 180 top
R150  2.2k  [C0402]  127.26 16.75 90 bottom
R151  2.2k  [C0402]  126.76 13.25 180 bottom
R152  2.2k  [C0402]  124.01 22.5 180 bottom
R153  2.2k  [C0402]  128.01 22.5 0 bottom
R155  1k  [C0402]  9.01 56.5 180 top
R156  1k  [C0402]  9.01 43.5 180 top
R157  2.2k  [C0402]  9.01 55.5 0 top
R158  2.2k  [C0402]  9.01 42.5 0 top
R159  200  [C0402]  12.26 52.75 90 top
R160  200  [C0402]  12.26 39.5 90 top
R161  200  [C0402]  13.26 52.75 90 top
R162  200  [C0402]  13.26 39.5 90 top
R163  200  [C0402]  14.26 52.75 90 top
R164  200  [C0402]  14.26 39.5 90 top
R165  200  [C0402]  15.26 52.75 90 top
R166  200  [C0402]  15.26 39.5 90 top
R167  200  [C0402]  15.01 63.25 180 bottom
R168  200  [C0402]  15.51 49.75 180 bottom
R169  200  [C0402]  15.01 62.25 180 bottom
R170  200  [C0402]  15.51 48.75 180 bottom
R171  200  [C0402]  21.51 60.5 180 top
R172  200  [C0402]  21.01 48.5 180 top
R173  200  [C0402]  21.51 59.5 180 top
R174  200  [C0402]  21.01 47.5 180 top
R175  200  [C0402]  19.01 59 180 bottom
R176  200  [C0402]  19.01 47 180 bottom
R177  200  [C0402]  19.01 58 180 bottom
R178  200  [C0402]  19.01 46 180 bottom
R179  200  [C0402]  21.51 57.5 180 top
R180  200  [C0402]  21.51 45.5 180 top
R181  200  [C0402]  21.51 56.5 180 top
R182  200  [C0402]  21.51 44.5 180 top
R183  200  [C0402]  19.26 56 180 bottom
R184  200  [C0402]  19.01 44 180 bottom
R185  200  [C0402]  19.26 55 180 bottom
R186  200  [C0402]  19.01 43 180 bottom
R187  200  [C0402]  21.51 54.5 180 top
R188  200  [C0402]  21.51 42.5 180 top
R189  200  [C0402]  21.51 53.5 180 top
R190  200  [C0402]  21.51 41.5 180 top
SW1  HDT0001  [SW_HDT0001]  149.65 5 180 top
T1  -  [SOTFL50P160X60-3N]  128.01 9 180 top
T2  -  [SOTFL50P160X60-3N]  76.26 52.75 90 top
TE1  -  [3M_5607-5102-SH]  117.26 48.5 90 bottom
TIMING1  -  [QFN50P300X300X90-17N-S160]  131.01 23 180 top
TP1  -  [TP_HOLE_10]  -18.69 73.5 0 top
TP2  -  [TP_HOLE_10]  80.76 70 0 top
TP3  -  [TP_HOLE_10]  -18.39 63.7 0 top
TP4  5002 WHITE  [TP_KEYSTONE_5000A]  60.51 7.5 0 top
TP5  5002 WHITE  [TP_KEYSTONE_5000A]  108.01 7.5 0 top
TP6  5002 WHITE  [TP_KEYSTONE_5000A]  42.01 -3 0 top
TP8  5002 WHITE  [TP_KEYSTONE_5000A]  72.76 46 0 top
TP15  5002 WHITE  [TP_KEYSTONE_5000A]  110.51 21 0 top
U1  5151230F  [LP_515XXX]  170.82 65.02 270 top
U2  -  [SOIC8]  131.01 50 0 top
U3  -  [SOIC8]  131.01 33 0 top
U5  2227023-1  [SFP_CAGE]  145.24 54.78 180 top
U6  SI5395A-A-GM  [QFN_64]  86.98 50.15 180 top
U8  -  [SOIC8]  131.01 16 0 top
U11  2227023-1  [SFP_CAGE]  145.24 37.79 180 top
U13  ATMEGA128A-MU  [QFN_64]  16.64 26.04 0 top
U14  2227023-1  [SFP_CAGE]  145.24 20.8 180 top
U15  SN74LVC1G06  [SOT23-5]  12.76 17.75 90 top
U16  TPS74618PQWDRVRQ1  [6-WSON_2X2]  69.76 43 270 top
U18  24AA025E48T-I/SN  [SOIC8]  37.76 65.5 0 top
U25  LM75AIMME/NOPB  [TSSOP8_65P440X300MM]  68.01 58.25 0 top

## Library data of the parts
C1 C2 C39 C40 C43 C45 = CAP_NP_0: Tolerance: TOL?; User Part Number: 445-7348-2-ND; part number: CAP_NP_0-445-7348-2-ND,CAP_NP_0; room: TE0712
C3 C4 C28 C31 C33-C36 = CAP_NP_0: Tolerance: TOL?; User Part Number: 445-7348-2-ND; part number: CAP_NP_0-445-7348-2-ND,CAP_NP_0; room: CLK_GEN_X12
C5-C7 C114 C116 C118 = CAPCERSMDCL2: part number: CAPCERSMDCL2_0402-1UF,16V; tolerance: 10%; room: SFP_DFF_AND_FANOUT
C8 C139 C148 C165 C166 C175-C186 = CAPCERSMDCL2: Tolerance: 10%; User Part Number: CC0402_100NF_16V_10%_X7R; part number: CAPCERSMDCL2_0402-100NF,16V_GEN; tolerance: 10%; room: CLK_FO_6_11
C9 C147 = CAP_NP: Tolerance: TOL?; User Part Number: GRM152R60J105ME15D; part number: CAP_NP-GRM152R60J105ME15D,CAP_NP; room: CLK_FO_6_11
C10 C11 = CAP_NP_0: Tolerance: TOL?; User Part Number: 445-7348-2-ND; part number: CAP_NP_0-445-7348-2-ND,CAP_NP_0; room: CLK_FO_0_5
C12-C15 C24 C27 C29 C32 C49 C97-C102 C105 C106 C113 C119 C120 C122 = CAPCERSMDCL2: part number: CAPCERSMDCL2_0402-100NF,16V_GEN; tolerance: 10%; room: SFP_DFF_AND_FANOUT
C16 C95 = CAP_NP: Tolerance: TOL?; User Part Number: GRM31CD80J107ME39K; part number: CAP_NP-GRM31CD80J107ME39K,CAP_NP; room: MAIN_PWR
C17 C44 C77 C80 = CAP_POL: part number: CAP_POL-6TPE470MAZU,CAP_POL; room: MAIN_PWR
C18 C21 C22 C123-C125 = CAPCERSMDCL2: part number: CAPCERSMDCL2_0402-1NF_X7R,50V; tolerance: 10%; room: SFP_DFF_AND_FANOUT
C19 C37 C135 C136 C187-C199 = CAPCERSMDCL2: Tolerance: 10%; User Part Number: CC0402_100NF_16V_10%_X7R; part number: CAPCERSMDCL2_0402-100NF,16V_GEN; tolerance: 10%; room: CLK_FO_0_5
C20 C38 = CAP_NP: Tolerance: TOL?; User Part Number: GRM152R60J105ME15D; part number: CAP_NP-GRM152R60J105ME15D,CAP_NP; room: CLK_FO_0_5
C23 C41 = CAPCERSMDCL2: part number: CAPCERSMDCL2_0603-1UF,16V; tolerance: 10%
C25 = ELCAPTAN: part number: ELCAPTAN_SMD-220UF,25V; tolerance: 20%; room: POWER
C26 C30 = CAP_NP_0: Tolerance: TOL?; User Part Number: 445-7348-2-ND; part number: CAP_NP_0-445-7348-2-ND,CAP_NP_0; room: CLK_FO_6_11
C42 C47 C48 C92 = CAP_NP: Tolerance: TOL?; User Part Number: 445-8173-1-ND; part number: CAP_NP-445-8173-1-ND,CAP_NP; room: MAIN_PWR
C46 = CAP_NP: Tolerance: TOL?; User Part Number: GRM155R60J474KE19J; part number: CAP_NP-GRM155R60J474KE19J,CAP_NP; room: MMC_DISCRETE
C53 C93 C104 = CAP_NP: Tolerance: TOL?; User Part Number: C0402C104K9RACTU; part number: CAP_NP-C0402C104K9RACTU,CAP_NP; room: MMC_DISCRETE
C54-C56 C60 = CAP_NP: Tolerance: TOL?; User Part Number: GRM21BR60J476ME15K; part number: CAP_NP-GRM21BR60J476ME15K,CAP_NP; room: VCC1V8
C57 C64 = CAP_NP: Tolerance: TOL?; User Part Number: 445-7348-2-ND; part number: CAP_NP-445-7348-2-ND,CAP_NP; room: VCC1V8
C66 = CAP_NP: Tolerance: TOL?; User Part Number: 445-7348-2-ND; part number: CAP_NP-445-7348-2-ND,CAP_NP; room: EEPROM
C86 C90 C94 C107 C111 C115 C140 C145 C156 = CAP_NP: Tolerance: TOL?; User Part Number: 445-7348-2-ND; part number: CAP_NP-445-7348-2-ND,CAP_NP; room: SFP0
C87 C108 C141 = CAP_NP: Tolerance: TOL?; User Part Number: GRM188R61A106KE69D; part number: CAP_NP-GRM188R61A106KE69D,CAP_NP; room: SFP0
C88 C96 C109 C117 C143 C161 = CAP_NP: Tolerance: TOL?; User Part Number: GRM188R60J226MEA0D; part number: CAP_NP-GRM188R60J226MEA0D,CAP_NP; room: SFP0
C89 C110 C144 = CAP_NP: Tolerance: TOL?; User Part Number: GRT155R61E105ME01D; part number: CAP_NP-GRT155R61E105ME01D,CAP_NP; room: SFP0
C91 = CAP_NP_0: Tolerance: TOL?; User Part Number: 445-7348-2-ND; part number: CAP_NP_0-445-7348-2-ND,CAP_NP_0; room: MAIN_PWR
C103 = CAP_NP: Tolerance: TOL?; User Part Number: 445-7348-2-ND; part number: CAP_NP-445-7348-2-ND,CAP_NP; room: JTAG
C112 C121 = CAP_NP: Tolerance: TOL?; User Part Number: GRM188R61A106KE69D; part number: CAP_NP-GRM188R61A106KE69D,CAP_NP; room: CLK_FO_0_5
C126-C129 C162 C163 C171 C172 = CAPCERSMDCL2: part number: CAPCERSMDCL2_0603-10UF,6.3V; tolerance: 20%; room: CLK_GEN_X12
C130-C132 C134 C160 C168 C173 = CAPCERSMDCL2: part number: CAPCERSMDCL2_0402-1UF,16V; tolerance: 10%; room: CLK_GEN_X12
C133 C137 C138 C142 C146 C149-C154 C157-C159 C167 C169 C170 C174 = CAPCERSMDCL2: part number: CAPCERSMDCL2_0402-100NF,16V_GEN; tolerance: 10%; room: CLK_GEN_X12
C155 = CAP_NP: Tolerance: TOL?; User Part Number: GRM188R61A106KE69D; part number: CAP_NP-GRM188R61A106KE69D,CAP_NP; room: CLK_FO_6_11
D1 D5 = LED GREEN 0603_0: part number: LED GREEN 0603_0-LNJ326W83RA,LED GREEN 0603_0; room: MMC
D2 = LED RED 0603_0: part number: LED RED 0603_0-LNJ237W82RA,LED RED 0603_0; room: MMC
D3 = LED_0: part number: LED_0-LTST-C193TBKT-5A,LED_0; room: MMC
D4 = LED RED 0603_0: part number: LED RED 0603_0-LNJ237W82RA,LED RED 0603_0; room: VCC3V3I_V
D6 = LED GREEN 0603_0: part number: LED GREEN 0603_0-LNJ326W83RA,LED GREEN 0603_0; room: POWER
D8-D11 = TVS_2X: Tolerance: TOL?; part number: TVS_2X-PGB1010603NR,TVS_2X; room: JTAG
D12 = DIODE: part number: DIODE-1N4148W-13-F,DIODE; room: MMC_DISCRETE
IC1 IC2 TIMING1 = SY58608U: part number: SY58608UMG; room: SFP_DFF_AND_FANOUT
IC3 = ADCLK948: part number: ADCLK948BCPZ; room: CLK_FO_0_5
IC4 = ADCLK948: part number: ADCLK948BCPZ; room: CLK_FO_6_11
IC5 = OPTOCOUPLER_AC_EC: part number: TOSHIBA; room: POWER
IC6 = LTC2991: part number: LTC2991CMS#PBF; room: POWER
J1 = TE0712 CONNECTOR-JB1: part number: TE0712 CONNECTOR-JB1-LSHM-150-03.0-L-DV-A-S-K-TR,TE0712 CONNECTOR-JB1
J2 = LSHM-130-0XXX-L-DV-A-S: part number: LSHM-130-0XXX-L-DV-A-S-LSHM-130-03.0-L-DV-A-S-K-TR,LSHM-130-0XXX-L-DV-A-S
J3 J6 J11 = CON20P_SFP-1367073-1: part number: CON20P_SFP-1367073-1-1367073-1,CON20P_SFP-1367073-1; room: SFP0
J4 = CONN30P: part number: CONN30P-FTSH-115-01-L-DV,CONN30P
J5 = TE0712 CONNECTOR-JB3: part number: TE0712 CONNECTOR-JB3-LSHM-130-03.0-L-DV-A-S-K-TR,TE0712 CONNECTOR-JB3
J7 = MCH_CONNECTOR1: part number: MCH_CONNECTOR1-MCH1B-EDGE-170,MCH_CONNECTOR1
J8 = TE0712 CONNECTOR-JB2: part number: TE0712 CONNECTOR-JB2-LSHM-150-03.0-L-DV-A-S-K-TR,TE0712 CONNECTOR-JB2
J9 = LSHM-150-0XXX-L-DV-A-S: part number: LSHM-150-0XXX-L-DV-A-S-LSHM-150-03.0-L-DV-A-S-K-TR,LSHM-150-0XXX-L-DV-A-S
J10 = 7X2RECPT_SMD_2MM: User Part Number: 878321420; part number: 7X2RECPT_SMD_2MM-878321420,7X2RECPT_SMD_2MM; room: JTAG
J12 = HDR1X3: part number: HDR1X3-HDR1X3,HDR1X3; room: USB-JTAG
J14 J15 = PCOAX: part number: PCOAX-U.FL-R-SMT-1(10); room: CLK_GEN_X12
J16 = CON4P: part number: CON4P-53398-0471
L1-L3 L10 = IND: part number: IND-BLM18AG121SN1D,IND; room: CLK_GEN_X12
L4 = IND: part number: IND-74438323100,IND; room: MMC_DISCRETE
L5 L6 = IND: part number: IND-CIGT201208EH1R0MNE,IND; room: SFP1
L7 L8 = IND: part number: IND-CIGT201208EH1R0MNE,IND; room: SFP2
L9 = FERRITE: part number: FERRITE_SMD-BLM21PG221SN1,MURATA; room: CLK_FO_0_5
L11 L13 = IND: part number: IND-CIGT201208EH1R0MNE,IND; room: SFP3
L12 = FERRITE: part number: FERRITE_SMD-MPZ1608S101A,TDK
MH1-MH4 = MT_HOLE: part number: MT_HOLE-MT_HOLE,MT_HOLE; room: TE0712
MH5-MH10 = MT_HOLE: part number: MT_HOLE-MT_HOLE,MT_HOLE
P1 = RECPT 5X2 100MIL: part number: RECPT 5X2 100MIL-RECP5X2,RECPT 5X2 100MIL
POWER1 PWR1 = PTH08T210W: part number: PTH08T210WAD; room: POWER
QZ1 = OSC_6P_ENDIS_OUTP_OUTN: part number: SIT5021AI-2DE-25E-50.000000; room: CLK_GEN_X12
R1 R2 R4 R7-R10 R12 R14 R15 R18 R134 = R: Tolerance: TOL?; User Part Number: ERJ-2RKF1000X; part number: R-ERJ-2RKF1000X,R; room: SFP_DFF_AND_FANOUT
R3 R5 = R: Tolerance: TOL?; User Part Number: EMA-00003608; part number: R-EMA-00003608,R; room: MMC
R6 = R: Tolerance: TOL?; User Part Number: ERJ-3EKF1600V; part number: R-ERJ-3EKF1600V,R; room: MMC
R11 R155 = RSMD0402: part number: RSMD0402_1/16W-1K,1%; tolerance: 1%; room: CLK_FO_0_5
R13 = R: Tolerance: TOL?; User Part Number: ERJ-2RKF4991X; part number: R-ERJ-2RKF4991X,R; room: TE0712
R16 R31 R48 R50 R51 R53 = R: Tolerance: TOL?; User Part Number: 311-24.9LRCT-ND; part number: R-311-24.9LRCT-ND,R; room: JTAG
R19 R26 R28 R29 R35 R36 = R: Tolerance: TOL?; User Part Number: EMA-00007500V42; part number: R-EMA-00007500V42,R; room: SFP_DFF_AND_FANOUT
R20 R23 = R: Tolerance: TOL?; User Part Number: 311-49.9LRCT-ND; part number: R-311-49.9LRCT-ND,R; room: CLK_GEN_X12
R21 R22 = R: Tolerance: TOL?; User Part Number: ERJ-2RKF4990X; part number: R-ERJ-2RKF4990X,R; room: CLK_GEN_X12
R24 R156 = RSMD0402: part number: RSMD0402_1/16W-1K,1%; tolerance: 1%; room: CLK_FO_6_11
R25 R27 R30 R32 R34 = R: Tolerance: TOL?; User Part Number: ERJ-2RKF1000X; part number: R-ERJ-2RKF1000X,R; room: CLK_GEN_X12
R33 R103 R111 = R: Tolerance: TOL?; User Part Number: ERJ-2RKF1503X; part number: R-ERJ-2RKF1503X,R; room: MMC_DISCRETE
R37 R38 R40 R42 R101 R118 R139-R144 = RSMD0402: part number: RSMD0402_1/16W-1K,1%; tolerance: 1%; room: SFP_DFF_AND_FANOUT
R39 R44 R45 R47 R57 R61 R93 = R: Tolerance: TOL?; User Part Number: ERJ-2RKF3302X; part number: R-ERJ-2RKF3302X,R; room: MMC_DISCRETE
R41 R52 = R: Tolerance: TOL?; User Part Number: ERJ-2RKF4701X; part number: R-ERJ-2RKF4701X,R; room: MMC_DISCRETE
R43 R46 R49 R100 R145 R146 R148-R153 = RSMD0402: part number: RSMD0402_1/16W-2.2K,1%; tolerance: 1%; room: SFP_DFF_AND_FANOUT
R54 R58 = R: Tolerance: TOL?; User Part Number: ERJ-2RKF2201X; part number: R-ERJ-2RKF2201X,R; room: MMC
R55 R56 = R: Tolerance: TOL?; User Part Number: ERJ-2RKF49R9X; part number: R-ERJ-2RKF49R9X,R; room: MMC_DISCRETE
R59 R67 = R: Tolerance: TOL?; User Part Number: ERJ-2RKF4991X; part number: R-ERJ-2RKF4991X,R; room: VCC1V8
R60 R70 = RSMD0603: part number: RSMD0603_1/10W-1.6K,1%; tolerance: 1%; room: POWER
R62 R97 = R: Tolerance: TOL?; User Part Number: PMR18EZPFU5L00; part number: R-PMR18EZPFU5L00,R; room: MAIN_PWR
R63 = R: Tolerance: TOL?; User Part Number: EMA-00003608; part number: R-EMA-00003608,R; room: POWER
R64 R66 R69 R82 R84 = RSMD0603: part number: RSMD0603_-00,; room: POWER
R65 R79 R81 R83 = RSMD0603: part number: RSMD0603_1/10W-XX,1%; tolerance: 1%; room: POWER
R68 = R: Tolerance: TOL?; User Part Number: ERJ-2RKF1001X; part number: R-ERJ-2RKF1001X,R; room: VCC1V8
R72 = R: Tolerance: TOL?; User Part Number: M55342K11B10E0RS3; part number: R-M55342K11B10E0RS3,R; room: VCC1V8
R73 R75 R77 = R: Tolerance: TOL?; User Part Number: EMA-00007500V42; part number: R-EMA-00007500V42,R; room: EEPROM
R74 R76 R78 = R: Tolerance: TOL?; User Part Number: NO_STUFF; part number: R-NO_STUFF,R; room: EEPROM
R80 = R: Tolerance: TOL?; User Part Number: ERJ-6GEY0R00V; part number: R-ERJ-6GEY0R00V,R
R87 = R: Tolerance: TOL?; User Part Number: ERJ-6BWFR020V; part number: R-ERJ-6BWFR020V,R; room: VCC1V8
R92 R95 R96 R98 R99 R112 R114-R117 R128 R130-R133 = R: Tolerance: TOL?; User Part Number: ERJ-2RKF4991X; part number: R-ERJ-2RKF4991X,R; room: SFP0
R94 R106 R136 = R: Tolerance: TOL?; User Part Number: M55342K11B10E0RS3; part number: R-M55342K11B10E0RS3,R
R102 = R: Tolerance: TOL?; User Part Number: ERJ-2RKF33R0X; part number: R-ERJ-2RKF33R0X,R; room: MMC_DISCRETE
R104 = R: Tolerance: TOL?; User Part Number: ERJ-2RKF3903X; part number: R-ERJ-2RKF3903X,R; room: MMC_DISCRETE
R105 = R: Tolerance: TOL?; User Part Number: ERJ-PA2F3300X; part number: R-ERJ-PA2F3300X,R; room: MMC_DISCRETE
R107-R109 R113 = R: Tolerance: TOL?; User Part Number: ERJ-2RKF1001X; part number: R-ERJ-2RKF1001X,R; room: MMC_DISCRETE
R110 = R: Tolerance: TOL?; User Part Number: ERA-2AEB303X; part number: R-ERA-2AEB303X,R; room: MMC_DISCRETE
R119 R120 R126 = R: Tolerance: TOL?; User Part Number: ERJ-2RKF2201X; part number: R-ERJ-2RKF2201X,R; room: SFP I2C SWITCH
R123 R129 = R: Tolerance: TOL?; User Part Number: ERJ-2RKF4991X; part number: R-ERJ-2RKF4991X,R; room: CLK_GEN_X12
R135 = R: Tolerance: TOL?; User Part Number: EMA-00003608; part number: R-EMA-00003608,R; room: VCC3V3I_V
R138 = R: Tolerance: TOL?; User Part Number: CRCW060310M0FKEAC; part number: R-CRCW060310M0FKEAC,R
R157 = RSMD0402: part number: RSMD0402_1/16W-2.2K,1%; tolerance: 1%; room: CLK_FO_0_5
R158 = RSMD0402: part number: RSMD0402_1/16W-2.2K,1%; tolerance: 1%; room: CLK_FO_6_11
R159 R161 R163 R165 R167 R169 R171 R173 R175 R177 R179 R181 R183 R185 R187 R189 = RSMD0402: part number: RSMD0402_1/16W-200,1%; tolerance: 1%; room: CLK_FO_0_5
R160 R162 R164 R166 R168 R170 R172 R174 R176 R178 R180 R182 R184 R186 R188 R190 = RSMD0402: part number: RSMD0402_1/16W-200,1%; tolerance: 1%; room: CLK_FO_6_11
SW1 = HDT0001: part number: HDT0001-HDT0001,HDT0001; room: MMC
T1 T2 = TRANS MOSFET: part number: TRANS MOSFET_GSD-PJE8408,SOT523; room: POWER
TE1 = CON7P: part number: CON7P-5607-5102-SH
TP1-TP3 = TP: part number: TP_HOLE-1.0MM
TP4-TP6 TP15 = TESTPOINT: part number: TESTPOINT-EMA-00001481V22,TESTPOINT; room: MAIN_PWR
TP8 = TESTPOINT: part number: TESTPOINT-EMA-00001481V22,TESTPOINT; room: VCC1V8
U1 = LP_515XXX: part number: LP_515XXX-5151230F,LP_515XXX
U2 U3 U8 = MAX9381ESA: part number: MAX9381ESA_SMD-MAX9381ESA; room: SFP_DFF_AND_FANOUT
U5 U11 U14 = SFP_CAGE-2227023-1: part number: SFP_CAGE-2227023-1-2227023-1,SFP_CAGE-2227023-1; room: SFP0
U6 = SI5395A-A-GM: part number: SI5395A-A-GM-SI5395A-A-GM,SI5395A-A-GM; room: CLK_GEN_X12
U13 = ATMGA128: part number: ATMGA128-ATMEGA128A-MU,ATMGA128; room: MMC_DISCRETE
U15 = INV_1CH_OD: part number: INV_1CH_OD-SN74LVC1G06DBVTE4,INV_1CH_OD; room: MMC_DISCRETE
U16 = TPS74618P: part number: TPS74618P-TPS74618PQWDRVRQ1,TPS74618P; room: VCC1V8
U18 = 24AA025E48T-I/SN: part number: 24AA025E48T-I/SN-24AA025E48T-I/SN,24AA025E48T-I/SN; room: EEPROM
U25 = LM75A: part number: LM75A-LM75AIMME/NOPB,LM75A

## Footprints (pads in the part's own frame, mm; a bottom-side part is the same pattern mirrored in y, then rotated)
3M_5607-5102-SH
  round 1.1 hole 0.6: 1(3.81,-0.5) 2(2.54,0.5) 3(1.27,0.5) 4(0,-0.5) 5(-1.27,0.5) 6(-2.54,0.5) 7(-3.81,-0.5)
  round 1.85 hole 1.35: 8(-6.48,0) 9(6.48,0)
6-WSON_2X2
  rrect 0.5x0.3 smd: 1(-0.95,0.65) 2(-0.95,0) 3(-0.95,-0.65) 4(0.95,-0.65) 5(0.95,0) 6(0.95,0.65)
  rrect 0.9x1.6 smd: 7(0,0)
AMC0_R2_BPLUS_PCB_EDGE
  rect 1.3x0.5 smd: (-0.888,21) (-0.888,9.75) (-0.888,-1.5) (-0.888,-12.75) (-0.888,-19.5) (-0.888,-26.25) (-0.888,-27.75) (-0.888,-27.75) (-0.888,-28.5) (-0.888,-28.5) (-0.888,-29.25) (-0.888,-30) (-0.888,-30.75)
  rect 1.7x0.5 smd: (-0.7,30.75) (-0.7,30) (-0.7,28.5) (-0.7,28.5) (-0.7,27.75) (-0.7,27.75) (-0.7,26.25) (-0.7,26.25) (-0.7,25.5) (-0.7,25.5) (-0.7,24) (-0.7,24) (-0.7,23.25) (-0.7,23.25) (-0.7,21.75) (-0.7,21) (-0.7,19.5) (-0.7,19.5) (-0.7,18.75) (-0.7,18.75) (-0.7,17.25) (-0.7,17.25) (-0.7,16.5) (-0.7,16.5) (-0.7,15) (-0.7,15) (-0.7,14.25) (-0.7,14.25) (-0.7,12.75) (-0.7,12.75) (-0.7,12) (-0.7,10.5) (-0.7,9.75) (-0.7,8.25) (-0.7,8.25) (-0.7,7.5) (-0.7,7.5) (-0.7,6) (-0.7,6) (-0.7,5.25) (-0.7,5.25) (-0.7,3.75) (-0.7,3.75) (-0.7,3) (-0.7,3) (-0.7,1.5) (-0.7,1.5) (-0.7,0.75) (-0.7,0.75) (-0.7,-0.75) (-0.7,-1.5) (-0.7,-3) (-0.7,-3) (-0.7,-3.75) (-0.7,-3.75) (-0.7,-5.25) (-0.7,-5.25) (-0.7,-6) (-0.7,-6) (-0.7,-7.5) (-0.7,-7.5) (-0.7,-8.25) (-0.7,-8.25) (-0.7,-9.75) (-0.7,-9.75) (-0.7,-10.5) (-0.7,-10.5) (-0.7,-12) (-0.7,-12.75) (-0.7,-14.25) (-0.7,-14.25) (-0.7,-15) (-0.7,-15) (-0.7,-16.5) (-0.7,-16.5) (-0.7,-17.25) (-0.7,-17.25) (-0.7,-18.75) (-0.7,-19.5) (-0.7,-21) (-0.7,-21) (-0.7,-21.75) (-0.7,-21.75) (-0.7,-23.25) (-0.7,-23.25) (-0.7,-24) (-0.7,-24) (-0.7,-25.5) (-0.7,-26.25)
  rect 2x0.5 smd: (-0.55,30) (-0.55,-30)
  rect 3.1x0.5 smd: 1(0,-31.5) 2(0,-30.75) 4(0,-29.25) 7(0,-27) 9(0,-25.5) 10(0,-24.75) 13(0,-22.5) 16(0,-20.25) 18(0,-18.75) 19(0,-18) 22(0,-15.75) 25(0,-13.5) 27(0,-12) 28(0,-11.25) 31(0,-9) 34(0,-6.75) 37(0,-4.5) 40(0,-2.25) 42(0,-0.75) 43(0,0) 46(0,2.25) 49(0,4.5) 52(0,6.75) 55(0,9) 57(0,10.5) 58(0,11.25) 61(0,13.5) 64(0,15.75) 67(0,18) 70(0,20.25) 72(0,21.75) 73(0,22.5) 76(0,24.75) 79(0,27) 82(0,29.25) 84(0,30.75) 85(0,31.5) 86(0,31.5) 89(0,29.25) 92(0,27) 95(0,24.75) 98(0,22.5) 101(0,20.25) 104(0,18) 107(0,15.75) 110(0,13.5) 112(0,12) 113(0,11.25) 116(0,9) 119(0,6.75) 122(0,4.5) 125(0,2.25) 128(0,0) 131(0,-2.25) 134(0,-4.5) 137(0,-6.75) 140(0,-9) 143(0,-11.25) 146(0,-13.5) 149(0,-15.75) 152(0,-18) 155(0,-20.25) 158(0,-22.5) 161(0,-24.75) 164(0,-27) 170(0,-31.5)
  rect 0.9x0.5 smd: 3(1.1,-30) 83(1.1,30)
  rect 1.6x0.5 smd: 5(0.762,-28.5) 6(0.762,-27.75) 8(0.762,-26.25) 17(0.762,-19.5) 26(0.762,-12.75) 41(0.762,-1.5) 56(0.762,9.75) 71(0.762,21) 165(0.762,-27.75) 166(0.762,-28.5) 167(0.762,-29.25) 168(0.762,-30) 169(0.762,-30.75)
  rect 1.2x0.5 smd: 11(0.95,-24) 12(0.95,-23.25) 14(0.95,-21.75) 15(0.95,-21) 20(0.95,-17.25) 21(0.95,-16.5) 23(0.95,-15) 24(0.95,-14.25) 29(0.95,-10.5) 30(0.95,-9.75) 32(0.95,-8.25) 33(0.95,-7.5) 35(0.95,-6) 36(0.95,-5.25) 38(0.95,-3.75) 39(0.95,-3) 44(0.95,0.75) 45(0.95,1.5) 47(0.95,3) 48(0.95,3.75) 50(0.95,5.25) 51(0.95,6) 53(0.95,7.5) 54(0.95,8.25) 59(0.95,12) 60(0.95,12.75) 62(0.95,14.25) 63(0.95,15) 65(0.95,16.5) 66(0.95,17.25) 68(0.95,18.75) 69(0.95,19.5) 74(0.95,23.25) 75(0.95,24) 77(0.95,25.5) 78(0.95,26.25) 80(0.95,27.75) 81(0.95,28.5) 87(0.95,30.75) 88(0.95,30) 90(0.95,28.5) 91(0.95,27.75) 93(0.95,26.25) 94(0.95,25.5) 96(0.95,24) 97(0.95,23.25) 99(0.95,21.75) 100(0.95,21) 102(0.95,19.5) 103(0.95,18.75) 105(0.95,17.25) 106(0.95,16.5) 108(0.95,15) 109(0.95,14.25) 111(0.95,12.75) 114(0.95,10.5) 115(0.95,9.75) 117(0.95,8.25) 118(0.95,7.5) 120(0.95,6) 121(0.95,5.25) 123(0.95,3.75) 124(0.95,3) 126(0.95,1.5) 127(0.95,0.75) 129(0.95,-0.75) 130(0.95,-1.5) 132(0.95,-3) 133(0.95,-3.75) 135(0.95,-5.25) 136(0.95,-6) 138(0.95,-7.5) 139(0.95,-8.25) 141(0.95,-9.75) 142(0.95,-10.5) 144(0.95,-12) 145(0.95,-12.75) 147(0.95,-14.25) 148(0.95,-15) 150(0.95,-16.5) 151(0.95,-17.25) 153(0.95,-18.75) 154(0.95,-19.5) 156(0.95,-21) 157(0.95,-21.75) 159(0.95,-23.25) 160(0.95,-24) 162(0.95,-25.5) 163(0.95,-26.25)
C0402
  rect 0.6x0.6 smd: 1(-0.45,0) 2(0.45,0)
C0603
  rect 0.9x1 smd: 1(-0.75,0) 2(0.75,0)
C0805
  rect 1.2x1.4 smd: 1(-0.9,0) 2(0.9,0)
CAP0402
  rect 0.635x0.686 smd: 1(-0.499,0) 2(0.499,0)
CAP0603
  rect 1.05x1.08 smd: 1(-0.865,0) 2(0.865,0)
CAP0805
  rect 1.3x1.5 smd: 1(-1,0) 2(1,0)
CAP1206
  rect 1.5x2 smd: 1(-1.5,0) 2(1.5,0)
CAP2917
  rect 2.4x2.9 smd: 1(-3.048,0) 2(3.048,0)
CTE_VISHAY_597D-M
  rect 2.3x7.3 smd: 1(-2.95,0) 2(2.95,0)
D0603
  rect 1.05x1.08 smd: 1(-0.865,0) 2(0.865,0)
FTSH-115-01-L-DV
  rect 0.75x2.8 smd: 1(-8.255,-2.03) 2(-8.255,2.03) 3(-6.985,-2.03) 4(-6.985,2.03) 5(-5.715,-2.03) 6(-5.715,2.03) 7(-4.445,-2.03) 8(-4.445,2.03) 9(-3.175,-2.03) 10(-3.175,2.03) 11(-1.905,-2.03) 12(-1.905,2.03) 13(-0.635,-2.03) 14(-0.635,2.03) 15(0.635,-2.03) 16(0.635,2.03) 17(1.905,-2.03) 18(1.905,2.03) 19(3.175,-2.03) 20(3.175,2.03) 21(4.445,-2.03) 22(4.445,2.03) 23(5.715,-2.03) 24(5.715,2.03) 25(6.985,-2.03) 26(6.985,2.03) 27(8.255,-2.03) 28(8.255,2.03) 29(9.525,-2.032) 30(9.525,2.032)
HDR14PINSMD
  round 1.092 hole 0.991 unplated: (-5.004,0) (5.004,0)
  rect 0.991x2.743 smd: 1(5.994,2.134) 2(5.994,-2.134) 3(3.988,2.134) 4(3.988,-2.134) 5(2.007,2.134) 6(2.007,-2.134) 7(0,2.134) 8(0,-2.134) 9(-2.007,2.134) 10(-2.007,-2.134) 11(-3.988,2.134) 12(-3.988,-2.134) 13(-5.994,2.134) 14(-5.994,-2.134)
HDR_1X3
  round 1.524 hole 0.889: 1(0,0) 2(2.54,0) 3(5.08,0)
HIROSE_U-FL-R-SMT-1_10
  rect 1.05x1 smd: 1(0,1.525)
  rect 1.05x2.2 smd: 2(-1.475,0) 3(1.475,0)
INDC1608X95N
  rect 1x1 smd: 1(-0.75,0) 2(0.75,0)
INDC2013X105N
  rect 1.15x1.45 smd: 1(-0.9,0) 2(0.9,0)
INDC2520X220N
  rect 0.95x2.3 smd: 1(-1.25,0) 2(1.25,0)
LEDC1608X80N
  rect 0.9x0.95 smd: 1(-0.8,0) 2(0.8,0)
LP_515XXX
  round 1.524 hole 1.524 unplated: (-2.032,3.988) (0,0) (0,-3.988)
MOLEX_53398-0471
  rect 2.1x3 smd: (-3.175,-0.95) (5.675,-0.95)
  rect 0.8x1.3 smd: 1(-0.625,1.8) 2(0.625,1.8) 3(1.875,1.8) 4(3.125,1.8)
MOUNTHOLE
  round 6.096 hole 3.302: 1(0,0)
OSCSC254P500X700X100-6N
  rect 1.65x1.55 smd: 1(-2.2,2.54) 2(-2.2,0) 3(-2.2,-2.54) 4(2.2,-2.54) 5(2.2,0) 6(2.2,2.54)
PWS_TI_ECP-R-PDSS-T14
  round 2.1 hole 1.4: 1(-15.875,6.35) 2(-15.875,-6.35) 3(-12.7,-6.35) 4(-6.35,-6.35) 5(-3.175,-6.35) 6(0,-6.35) 7(3.175,-6.35) 8(9.525,-6.35) 9(12.7,-6.35) 10(15.875,-6.35) 11(15.875,-3.175) 12(15.875,0) 13(15.875,3.175) 14(15.875,6.35)
QFN50P300X300X90-17N-S160
  rect 0.85x0.25 smd: 1(-1.45,0.75) 2(-1.45,0.25) 3(-1.45,-0.25) 4(-1.45,-0.75) 9(1.45,-0.75) 10(1.45,-0.25) 11(1.45,0.25) 12(1.45,0.75)
  rect 0.25x0.85 smd: 5(-0.75,-1.45) 6(-0.25,-1.45) 7(0.25,-1.45) 8(0.75,-1.45) 13(0.75,1.45) 14(0.25,1.45) 15(-0.25,1.45) 16(-0.75,1.45)
  rect 1.6x1.6 smd: 17(0,0)
QFN50P500X500X100-33N-S285
  rect 0.8x0.3 smd: 1(-2.5,1.75) 2(-2.5,1.25) 3(-2.5,0.75) 4(-2.5,0.25) 5(-2.5,-0.25) 6(-2.5,-0.75) 7(-2.5,-1.25) 8(-2.5,-1.75) 17(2.5,-1.75) 18(2.5,-1.25) 19(2.5,-0.75) 20(2.5,-0.25) 21(2.5,0.25) 22(2.5,0.75) 23(2.5,1.25) 24(2.5,1.75)
  rect 0.3x0.8 smd: 9(-1.75,-2.5) 10(-1.25,-2.5) 11(-0.75,-2.5) 12(-0.25,-2.5) 13(0.25,-2.5) 14(0.75,-2.5) 15(1.25,-2.5) 16(1.75,-2.5) 25(1.75,2.5) 26(1.25,2.5) 27(0.75,2.5) 28(0.25,2.5) 29(-0.25,2.5) 30(-0.75,2.5) 31(-1.25,2.5) 32(-1.75,2.5)
  rect 2.85x2.85 smd: 33(0,0)
QFN_64
  rect 0.61x0.279 smd: 1(-4.394,3.75) 2(-4.394,3.25) 3(-4.394,2.75) 4(-4.394,2.25) 5(-4.394,1.75) 6(-4.394,1.25) 7(-4.394,0.75) 8(-4.394,0.25) 9(-4.394,-0.25) 10(-4.394,-0.75) 11(-4.394,-1.25) 12(-4.394,-1.75) 13(-4.394,-2.25) 14(-4.394,-2.75) 15(-4.394,-3.25) 16(-4.394,-3.75) 33(4.394,-3.75) 34(4.394,-3.25) 35(4.394,-2.75) 36(4.394,-2.25) 37(4.394,-1.75) 38(4.394,-1.25) 39(4.394,-0.75) 40(4.394,-0.25) 41(4.394,0.25) 42(4.394,0.75) 43(4.394,1.25) 44(4.394,1.75) 45(4.394,2.25) 46(4.394,2.75) 47(4.394,3.25) 48(4.394,3.75)
  rect 0.279x0.61 smd: 17(-3.75,-4.394) 18(-3.25,-4.394) 19(-2.75,-4.394) 20(-2.25,-4.394) 21(-1.75,-4.394) 22(-1.25,-4.394) 23(-0.75,-4.394) 24(-0.25,-4.394) 25(0.25,-4.394) 26(0.75,-4.394) 27(1.25,-4.394) 28(1.75,-4.394) 29(2.25,-4.394) 30(2.75,-4.394) 31(3.25,-4.394) 32(3.75,-4.394) 49(3.75,4.394) 50(3.25,4.394) 51(2.75,4.394) 52(2.25,4.394) 53(1.75,4.394) 54(1.25,4.394) 55(0.75,4.394) 56(0.25,4.394) 57(-0.25,4.394) 58(-0.75,4.394) 59(-1.25,4.394) 60(-1.75,4.394) 61(-2.25,4.394) 62(-2.75,4.394) 63(-3.25,4.394) 64(-3.75,4.394)
  rect 4.4x4.4 smd: 65(0,0)
RECPT5X2_100MIL_SM
  rect 3.251x1.27 smd: 1(-2.54,10.16) 2(2.54,10.16) 3(-2.54,7.62) 4(2.54,7.62) 5(-2.54,5.08) 6(2.54,5.08) 7(-2.54,2.54) 8(2.54,2.54) 9(-2.54,0) 10(2.54,0)
RES0402
  rect 0.55x0.6 smd: 1(-0.45,0) 2(0.45,0)
RES0603
  rect 0.95x0.95 smd: 1(-0.75,0) 2(0.75,0)
RES0805
  rect 1.1x1.4 smd: 1(-0.95,0) 2(0.95,0)
RES1206
  rect 1.25x1.75 smd: 1(-1.45,0) 2(1.45,0)
SAMTEC_LSHM-130-04-0-L-DV-A-S
  round 1 hole 1.45 unplated: (-8.5,-0.9) (8.5,-0.9)
  rect 0.3x1.5 smd: 1(7.25,-1.9) 2(7.25,1.8) 3(6.75,-1.9) 4(6.75,1.8) 5(6.25,-1.9) 6(6.25,1.8) 7(5.75,-1.9) 8(5.75,1.8) 9(5.25,-1.9) 10(5.25,1.8) 11(4.75,-1.9) 12(4.75,1.8) 13(4.25,-1.9) 14(4.25,1.8) 15(3.75,-1.9) 16(3.75,1.8) 17(3.25,-1.9) 18(3.25,1.8) 19(2.75,-1.9) 20(2.75,1.8) 21(2.25,-1.9) 22(2.25,1.8) 23(1.75,-1.9) 24(1.75,1.8) 25(1.25,-1.9) 26(1.25,1.8) 27(0.75,-1.9) 28(0.75,1.8) 29(0.25,-1.9) 30(0.25,1.8) 31(-0.25,-1.9) 32(-0.25,1.8) 33(-0.75,-1.9) 34(-0.75,1.8) 35(-1.25,-1.9) 36(-1.25,1.8) 37(-1.75,-1.9) 38(-1.75,1.8) 39(-2.25,-1.9) 40(-2.25,1.8) 41(-2.75,-1.9) 42(-2.75,1.8) 43(-3.25,-1.9) 44(-3.25,1.8) 45(-3.75,-1.9) 46(-3.75,1.8) 47(-4.25,-1.9) 48(-4.25,1.8) 49(-4.75,-1.9) 50(-4.75,1.8) 51(-5.25,-1.9) 52(-5.25,1.8) 53(-5.75,-1.9) 54(-5.75,1.8) 55(-6.25,-1.9) 56(-6.25,1.8) 57(-6.75,-1.9) 58(-6.75,1.8) 59(-7.25,-1.9) 60(-7.25,1.8)
  round 1.702 hole 1.016: 61(-9.975,1.1) 62(9.975,1.1)
